# Altium PCB Copy of PCB.PcbDoc (part 5 of 5)
Units mm, origin at the board's own origin, x right, y up, seen from the top; angles counter-clockwise.
Board outline 130 x 115.04 mm, 6 copper layers (Top Layer, Int1 (GND), Int2, Int3 (PWR), Int4 (GND), Bottom Layer), stack 1.647 mm thick; 306 components, 246 nets, 1107 pads, 360 vias.
Unrouted connection lines stored in the file: 123.
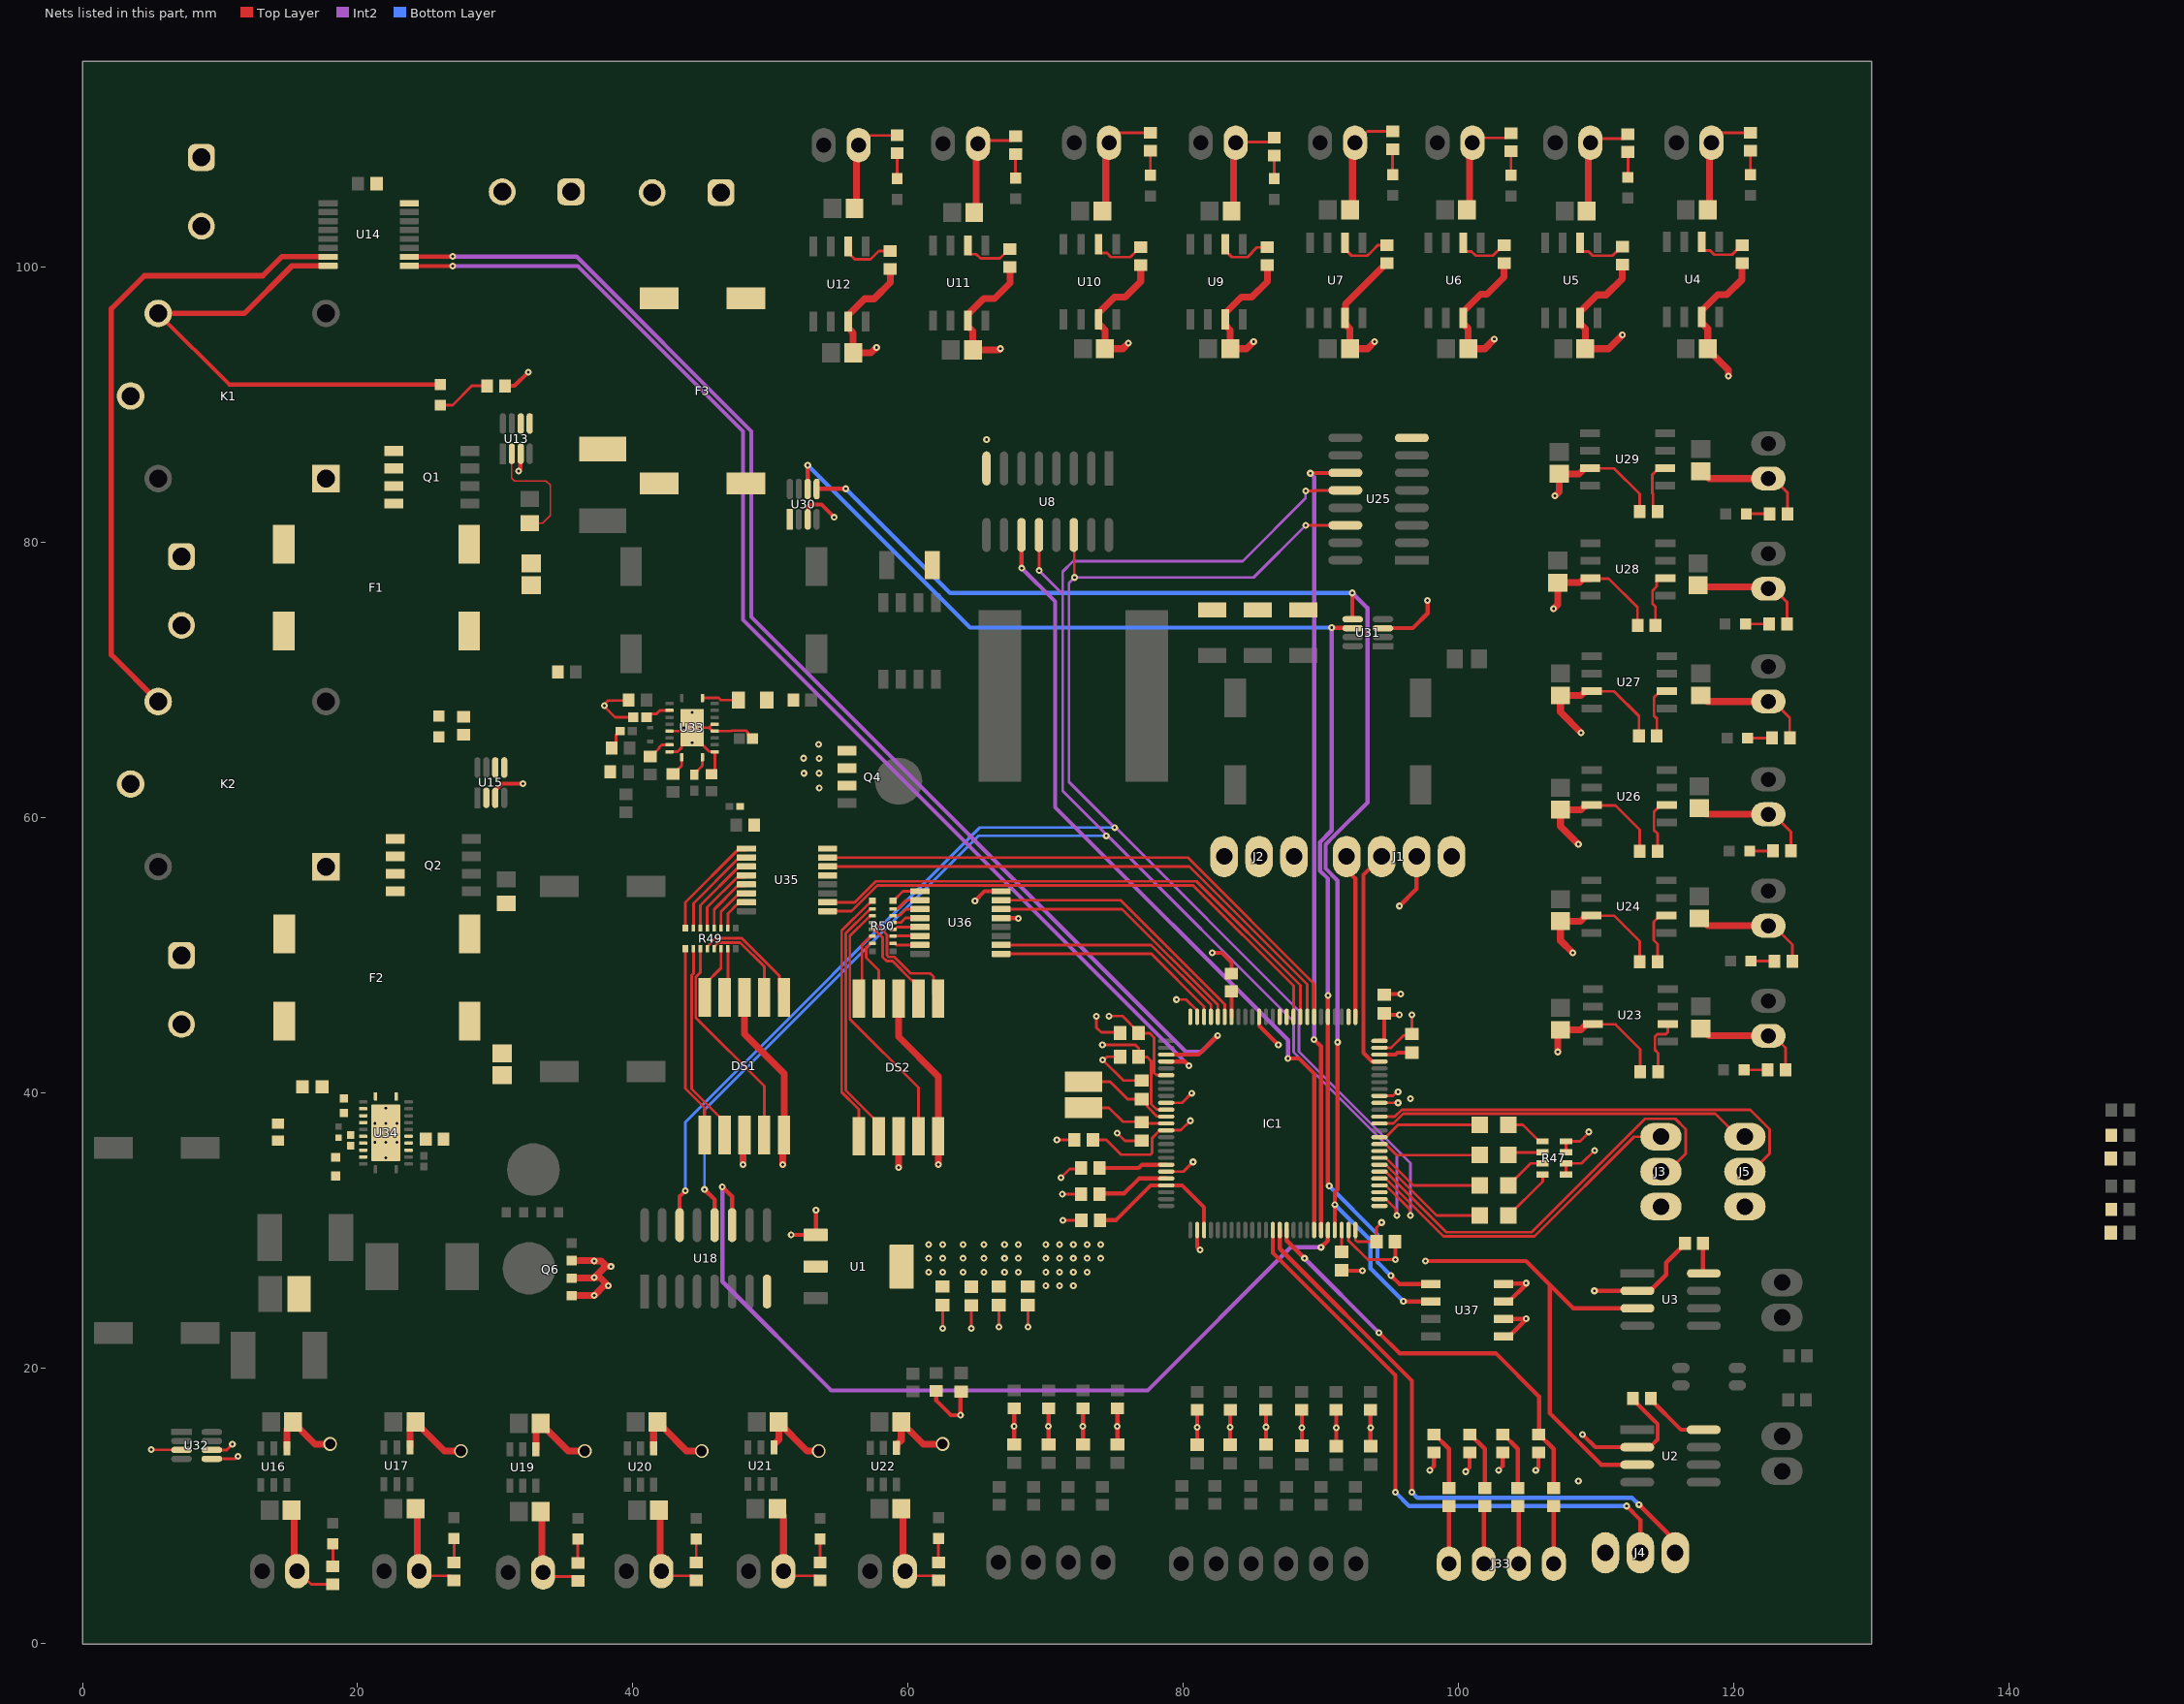
[diagram p7: the nets of this part, all layers, seen from the top]

## Via types
v1: diameter 0.5, hole 0.2, Top Layer to Bottom Layer, 354 vias
v2: diameter 1, hole 0.75, Top Layer to Bottom Layer, 6 vias

## Nets (pads, with @x,y where several pads share a name; then routed paths per layer and width w, separated by ;. In a path a pad name is that pad's centre, name@x,y a point inside that pad or via, vN(x,y) a via of type N, cw(c..) or ccw(c..) an arc to the next point about the centre after c; other vN are vias at no path point) (continued)
GND: C1.1 C2.1 C3.1 C4.1 C5.1 C6.1 C7.1 C8.1 C9.1 C10.2 C11.2 C12.1 C13.1 C14.1 C15.1 C16.1 C17.2 C18.1 C19.2 C20.1 C21.2 C22.1 C23.2 C24.1 C25.2 C26.1 C27.2 C28.1 C29.1 C30.1 C31.1 C32.1 C33.1 C34.1 C35.1 C36.1 C37.1 C38.1 C39.1 C40.1 C41.1 C42.1 C43.1 C44.1 C45.1 C46.1 C47.1 C48.2 C49.1 C50.2 C51.1 C52.2 C53.1 C54.2 C55.1 C56.2 C57.1 C58.2 C59.1 C60.1 C61.1 C62.1 C63.2 C64.1 C65.1 C66.1 C67.1 C68.1 C70.2 C71.1 C75.1 C76.1 C77.2 C78.2 C79.2 C80.2 C81.2 C82.2 C83.2 C84.2 C85.2 C86.2 C87.2 DS1.3 DS1.5 DS1.8 DS2.3 DS2.5 DS2.8 IC1.10 IC1.20 IC1.27 IC1.49 IC1.74 IC1.99 J1.1 J2.3 J3.3 J4.3 J5.3 J8.2 J9.2 J10.2 J11.2 J12.2 J13.2 J14.2 J15.2 J16.1 J17.2 J18.2 J19.1 J20.1 J21.1 J22.1 J23.1 J24.1 J25.2 J26.2 J27.2 J28.2 J29.2 J30.2 J31.1 J32.1 Q4.1 Q4.2 Q4.3 Q6.1 Q6.2 Q6.3 R1.2 R2.1 R3.1 R6.1 R7.1 R8.1 R9.1 R10.1 R11.1 R12.1 R13.1 R16.1 R17.1 R18.1 R19.1 R20.1 R21.1 R25.2 R27.2 R30.2 R31.2 R38.1 R39.1 R44.1 R46.1 R47.5 R47.6 R47.7 R47.8 R48.2 R51.2 R52.2 R53.2 R54.2 R55.2 R56.2 R57.2 R58.2 R59.2 R60.2 R61.2 R62.2 R63.2 R64.2 R65.2 R67.2 R69.2 R71.2 R73.1 R75.1 R77.1 R79.1 R81.2 R83.2 R85.2 R87.2 R89.2 R91.2 R93.2 R94.2 R95.2 R96.2 R97.2 R98.2 R99.2 U1.1 U2.2 U3.2 U4.3 U5.3 U6.3 U7.3 U8.8 U9.3 U10.3 U11.3 U12.3 U13.3 U14.8 U15.3 U16.4 U17.4 U18.8 U19.4 U20.4 U21.4 U22.4 U23.3 U24.3 U25.8 U26.3 U27.3 U28.3 U29.3 U30.3 U31.3 U32.3 U33.6 U33.9 U33.12 U33.15 U33.16 U33.21 U34.1 U34.7 U34.10 U34.16 U34.24 U34.25 U35.5 U35.8 U36.5 U36.8 U37.1 U37.2 U37.3 U37.4 | length 535.9
  Top Layer w0.2: v1(5,14.1) 5.012,14.088 7.187,14.088 U32.3@7.2,14.075 ; J19.1@15.6,5.264 15.644,5.264 16.608,4.3 R60.2@18.2,4.3 ; J20.1@24.47,5.264 24.809,4.925 26.675,4.925 R61.2@27,4.6 ; J21.1@33.47,5.164 33.759,4.875 35.675,4.875 R62.2@36,4.55 ; R38.1@39.7,68.564 39.665,68.529 38.192,68.529 38.075,68.412 38.075,68.402 37.929,68.256 37.929,68.091 38.706,67.314 C71.1@40.02,67.314 ; J22.1@42.07,5.264 42.409,4.925 44.275,4.925 R63.2@44.6,4.6 ; U33.9@42.65,64.814 43.25,64.814 43.55,65.114 43.55,65.314 43.7,65.464 v1(44.3,65.464) ; U33.6@42.65,66.314 43.55,66.314 43.7,66.464 v1(43.7,66.564) ; U33.21@44.3,66.564 44.3,66.064 45.525,64.839 45.925,64.839 U33.12@45.95,64.814 45.95,63.439 C68.1@45.7,63.189 ; v1(44.9,66.564) 45.525,66.564 ; U33.16@45.95,66.814 45.775,66.814 45.525,66.564 ; C70.2@48.677,65.764 48.655,65.764 48.375,66.044 48.375,66.177 48.208,66.344 47.194,66.344 47.164,66.314 U33.15@45.95,66.314 45.775,66.314 45.525,66.564 ; J23.1@50.94,5.264 51.279,4.925 53.275,4.925 R64.2@53.6,4.6 ; J15.2@56.4,108.9 56.444,108.9 57.144,109.6 R57.2@59.2,109.6 ; J24.1@59.77,5.264 60.109,4.925 61.875,4.925 R93.2@62.2,4.6 ; C5.1@62.492,24.606 62.5,24.598 v1(62.5,22.9) ; C6.1@64.592,24.581 64.6,24.573 v1(64.6,22.9) ; J14.2@65.07,109 65.295,109.225 67.475,109.225 R56.2@67.8,109.55 ; C3.1@66.578,24.599 66.6,24.578 v1(66.6,23) ; C4.1@68.692,24.606 68.7,24.598 v1(68.7,23) ; v1(70.803,36.606) C14.1@72.069,36.606 ; v1(71.095,33.858) 71.73,34.493 72.481,34.493 C12.1@72.558,34.57 ; v1(71.196,32.664) 72.554,32.664 C13.1@72.558,32.668 ; v1(71.247,30.759) 72.573,30.759 C8.1@72.583,30.77 ; v1(73.685,45.593) 73.685,44.755 74.016,44.425 75.347,44.425 C2.1@75.398,44.374 ; J13.2@74.6,109.064 74.644,109.064 75.38,109.8 R55.2@77.6,109.8 ; v1(75.2,37.1) 75.753,36.547 C16.1@76.962,36.547 ; C7.1@75.398,42.647 74.452,42.647 74.224,42.418 v1(74.143,42.418) 75.637,40.923 C15.1@76.962,40.923 ; IC1.20@78.75,34.3 80,34.3 v1(80.7,35) ; IC1.10@78.75,39.3 79.9,39.3 v1(80.6,40) ; v1(79.5,46.8) 80.2,46.8 81,46 IC1.99@81,45.55 ; J12.2@83.8,109.064 83.861,109.125 86.275,109.125 R54.2@86.6,109.45 ; C10.2@91.5,27.125 C10.2@91.525,27.1 ; IC1.49@92,30.05 92,29.3 93.4,27.9 v1(95.4,27.9) ; J11.2@92.47,109.064 92.514,109.064 93.35,109.9 R53.2@95.2,109.9 ; IC1.74@94.25,43.3 95.1,43.3 96,44.2 96.5,44.2 C11.2@96.6,44.3 v1(96.6,45.7) ; J10.2@101,109.064 101.361,109.425 103.475,109.425 R52.2@103.8,109.75 ; R47.5@107.8,34.1 R47.6@107.8,34.9 108.941,34.9 v1(109.88,35.839) ; R47.7@107.8,35.7 R47.8@107.8,36.5 108.814,36.5 109.449,37.135 v1(109.449,37.186) ; U29.3@109.55,85.424 109.575,85.4 111.3,85.4 113.15,83.55 R21.1@113.15,82.264 ; J9.2@109.57,109.064 109.881,109.375 111.975,109.375 R51.2@112.3,109.7 ; U28.3@109.604,77.4 110.9,77.4 113,75.3 R20.1@113,74 ; U24.3@109.675,52.9 111.3,52.9 113.15,51.05 R17.1@113.15,49.564 ; U26.3@109.675,60.929 109.704,60.9 111.4,60.9 113.15,59.15 R18.1@113.15,57.564 ; U27.3@109.675,69.229 109.704,69.2 111.3,69.2 113.1,67.4 R19.1@113.1,65.964 ; U23.3@109.775,45 111.4,45 113.2,43.2 R16.1@113.2,41.564 ; J8.2@118.37,109.064 118.414,109.064 119.15,109.8 R48.2@121.2,109.8 ; J25.2@122.5,44.164 122.875,44.164 123.75,43.289 R94.2@123.75,41.7 ; J26.2@122.5,52.164 122.875,52.164 124.25,50.789 R95.2@124.25,49.6 ; J27.2@122.5,60.264 122.875,60.264 124.15,58.989 R96.2@124.15,57.6 ; J28.2@122.5,68.464 122.875,68.464 124.058,67.281 R97.2@124.058,65.818 ; J29.2@122.5,76.664 122.875,76.664 123.861,75.678 R98.2@123.861,74.095 ; J30.2@122.5,84.664 122.875,84.664 123.9,83.639 R99.2@123.9,82.1
  Top Layer w0.3: U15.3@30,61.464 30,62.014 30.486,62.5 v1(32,62.5) ; R58.2@30.7,91.4 31.4,91.4 v1(32.4,92.4) ; v1(31.7,85.2) 31.7,85.254 31.82,85.374 31.82,86.434 U13.3@31.85,86.464 ; DS1.3@48,36.864 DS1.3@48.1,36.964 ; DS1.5@50.9,36.884 DS1.5@50.98,36.964 ; v1(51.5,29.7) U1.1@53.275,29.7 53.3,29.725 v1(53.3,31.5) ; U30.3@52.7,81.7 52.73,81.73 52.73,82.604 52.901,82.775 53.7,82.775 v1(54.625,81.85) ; R30.2@62.043,18.363 62.043,17.657 63.1,16.6 v1(63.8,16.6) 63.8,18.27 C62.1@63.843,18.313 ; DS2.5@62.18,36.864 DS2.5@62.2,36.884 ; v1(64.85,53.975) 65.55,54.675 U36.8@66.75,54.675 ; U36.5@66.75,52.725 66.757,52.718 68.004,52.718 v1(68.011,52.711) ; C81.2@67.7,14.475 v1(67.7,15.787) R79.1@67.7,17.1 ; C80.2@70.2,14.475 v1(70.2,15.787) R77.1@70.2,17.1 ; C79.2@72.7,14.475 v1(72.7,15.787) R75.1@72.7,17.1 ; C78.2@75.2,14.475 v1(75.2,15.787) R73.1@75.2,17.1 ; C87.2@81,14.45 v1(81,15.725) R91.2@81,17 ; IC1.27@81,30.05 81,28.8 v1(81.2,28.6) ; v1(82.1,50.2) 82.8,50.2 83.5,49.5 R1.2@83.5,48.7 ; C86.2@83.4,14.45 v1(83.4,15.725) R89.2@83.4,17 ; C85.2@86,14.475 v1(86,15.737) R87.2@86,17 ; C84.2@88.6,14.375 v1(88.6,15.687) R85.2@88.6,17 ; C83.2@91.1,14.35 v1(91.1,15.675) R83.2@91.1,17 ; C10.2@91.525,27.1 v1(93,27.1) ; C82.2@93.6,14.35 v1(93.6,15.675) R81.2@93.6,17 ; U31.3@94.5,73.789 96.664,73.789 97.75,74.875 97.75,75.775 v1(97.725,75.8) ; C1.1@94.6,47.15 94.65,47.2 v1(95.8,47.2) ; C9.1@95.375,29.2 95.4,29.175 v1(95.4,27.9) ; v1(97.9,12.6) 98.2,12.9 R71.2@98.2,13.9 ; v1(100.5,12.5) 100.8,12.8 R69.2@100.8,13.9 ; v1(102.9,12.6) 103.2,12.9 R67.2@103.2,13.9 ; U37.1@103.268,22.327 103.668,22.327 104.9,23.559 v1(104.9,23.6) 104.898,23.598 U37.2@103.268,23.597 U37.2@103.268,23.597 ; U37.3@103.268,24.867 103.668,24.867 104.862,26.061 104.862,26.162 v1@104.868,26.168 ; U37.4@103.268,26.137 103.3,26.168 v1@104.868,26.168 ; v1(104.9,26.2) v1@104.868,26.168 ; v1(105.6,12.6) 105.8,12.8 R65.2@105.8,13.9 ; v1(109,15.2) 109.93,14.27 U2.2@112.973,14.27 113.896,14.27 114.457,14.831 114.457,15.955 114.311,16.101 114.299,16.101 112.65,17.75 R2.1@112.65,17.8 ; v1(109.865,25.635) U3.2@112.986,25.635 113.91,25.635 115.073,26.798 115.073,27.673 116.45,29.05 R3.1@116.45,29.1
  Top Layer w0.5: U16.4@14.85,14.198 14.85,15.6 C36.1@15.3,16.05 ; C37.1@15.2,9.7 15.4,9.5 15.4,5.464 J19.1@15.6,5.264 ; C36.1@15.3,16.1 C36.1@15.3,16.05 ; v2(18,14.5) 16.9,14.5 15.75,15.65 15.7,15.65 C36.1@15.3,16.05 ; U17.4@23.8,14.264 23.804,14.268 23.804,15.704 C38.1@24.2,16.1 24.2,16.05 24.6,15.65 24.65,15.65 26.3,14 v2(27.5,14) ; C39.1@24.2,9.8 24.335,9.665 24.335,5.399 J20.1@24.47,5.264 ; U19.4@32.95,14.133 32.954,14.137 32.954,15.654 C40.1@33.3,16 33.3,15.95 33.7,15.55 33.75,15.55 35.3,14 v2(36.5,14) ; C41.1@33.3,9.6 33.385,9.515 33.385,5.249 J21.1@33.47,5.164 ; Q6.1@35.552,25.295 35.557,25.3 v1(37.2,25.3) 37.9,26 v1(38.2,26) 37.6,26.6 v1(37.2,26.6) ; Q6.2@35.552,26.565 37.165,26.565 v1(37.2,26.6) ; Q6.3@35.552,27.835 37.165,27.835 v1(37.2,27.8) 37.7,27.8 38.1,27.4 v1(38.4,27.4) ; 38,27.4 v1(37.2,26.6) ; U20.4@41.5,14.2 41.504,14.204 41.504,15.804 C42.1@41.8,16.1 41.8,16.05 42.2,15.65 42.25,15.65 43.9,14 v2(45,14) ; C43.1@41.9,9.7 41.985,9.615 41.985,5.349 J22.1@42.07,5.264 ; v1(48,34.8) DS1.3@48,36.864 ; DS1.8@48.1,46.964 48.1,44.3 50.98,41.42 DS1.5@50.98,36.964 ; U21.4@50.25,14.267 50.25,14.521 50.254,14.525 50.307,14.525 50.6,14.818 C44.1@50.6,16.05 ; C45.1@50.5,9.8 50.5,9.75 50.94,9.31 J23.1@50.94,5.264 ; C44.1@50.6,16.1 C44.1@50.6,16.05 ; v1(50.9,34.8) DS1.5@50.9,36.884 ; v2(53.5,14) 52.65,14 C44.1@50.6,16.05 ; C32.1@56.1,104.3 56.25,104.45 56.25,108.75 J15.2@56.4,108.9 ; v1(57.7,94.2) 57.3,93.8 C31.1@56,93.8 56,95.259 55.635,95.624 U12.3@55.635,96.075 55.635,96.527 56.836,97.728 57.528,97.728 58.7,98.9 R13.1@58.7,99.9 ; U22.4@59.15,14.233 59.15,14.487 59.154,14.492 59.207,14.492 59.5,14.784 C46.1@59.5,16.05 ; v1(59.3,34.6) DS2.3@59.3,36.864 ; DS2.8@59.3,46.864 59.3,44.1 62.2,41.2 DS2.5@62.2,36.884 ; C47.1@59.5,9.8 59.635,9.665 59.635,5.399 J24.1@59.77,5.264 ; C46.1@59.5,16.1 C46.1@59.5,16.05 ; v1(62.2,34.8) DS2.5@62.2,36.864 ; v2(62.5,14.5) 61.1,14.5 59.95,15.65 59.9,15.65 C46.1@59.5,16.05 ; C30.1@64.8,104 64.935,104.135 64.935,108.865 J14.2@65.07,109 ; v1(66.7,94.1) 66.6,94 C29.1@64.7,94 64.7,95.377 64.407,95.67 64.369,95.67 64.34,95.699 U11.3@64.34,96.15 64.34,96.602 65.491,97.753 66.278,97.753 67.4,98.875 R12.1@67.4,100.05 ; C28.1@74.1,104.1 74.361,104.361 74.361,108.825 J13.2@74.6,109.064 ; v1(76,94.5) 75.6,94.1 C27.2@74.3,94.1 74.3,95.466 74.007,95.758 73.864,95.758 73.835,95.788 U10.3@73.835,96.239 73.835,96.691 74.999,97.855 75.766,97.855 76.9,98.989 R11.1@76.9,100.164 ; C26.1@83.5,104.1 83.65,104.25 83.65,108.914 J12.2@83.8,109.064 ; v1(85.1,94.6) 84.6,94.1 C25.2@83.4,94.1 83.4,95.466 83.107,95.758 83.064,95.758 83.035,95.788 U9.3@83.035,96.239 83.035,96.691 84.199,97.855 84.966,97.855 86.1,98.989 R10.1@86.1,100.164 ; C24.1@92.1,104.2 92.285,104.385 92.285,108.879 J11.2@92.47,109.064 ; v1(93.9,94.6) 93.4,94.1 C23.2@92.1,94.1 92.1,95.55 91.792,95.858 91.764,95.858 91.735,95.888 U7.3@91.735,96.339 91.764,96.369 91.764,97.328 94.75,100.314 R9.1@94.8,100.314 ; C22.1@100.6,104.2 100.8,104.4 100.8,108.864 J10.2@101,109.064 ; v1(102.6,94.8) 101.9,94.1 C21.2@100.7,94.1 100.7,95.55 100.392,95.858 100.364,95.858 100.335,95.888 U6.3@100.335,96.339 100.335,96.791 101.606,98.062 102.058,98.062 103.3,99.304 R8.1@103.3,100.314 ; v1(106.9,75.2) 107.2,75.5 C56.2@107.2,77.1 108.795,77.1 109.095,77.4 U28.3@109.604,77.4 ; v1(107,83.4) 107.007,83.4 107.3,83.693 C58.2@107.3,85 108.75,85 109.07,85.32 109.07,85.395 109.099,85.424 U29.3@109.55,85.424 ; v1(107.2,43) 107.2,44.4 C48.2@107.4,44.6 108.875,44.6 109.275,45 U23.3@109.775,45 ; v1(108.3,50.2) 107.4,51.1 C50.2@107.4,52.5 108.85,52.5 109.17,52.82 109.17,52.895 109.175,52.9 U24.3@109.675,52.9 ; v1(108.7,58.1) 107.4,59.4 C52.2@107.4,60.6 108.895,60.6 109.224,60.929 U26.3@109.675,60.929 ; v1(108.9,66.2) 107.4,67.7 C54.2@107.4,68.9 108.895,68.9 109.224,69.229 U27.3@109.675,69.229 ; C20.1@109.3,104.1 109.435,104.235 109.435,108.929 J9.2@109.57,109.064 ; v1(111.9,95.1) 110.9,94.1 C19.2@109.2,94.1 109.2,95.55 108.892,95.858 108.864,95.858 108.835,95.888 U5.3@108.835,96.339 108.835,96.791 110.054,98.01 110.71,98.01 111.9,99.2 R7.1@111.9,100.214 ; C57.1@117.4,76.9 117.518,76.782 122.382,76.782 J29.2@122.5,76.664 ; C51.1@117.5,52.7 117.55,52.7 118.086,52.164 J26.2@122.5,52.164 ; C53.1@117.5,60.7 117.55,60.7 117.986,60.264 J27.2@122.5,60.264 ; C49.1@117.6,44.7 117.65,44.7 118.186,44.164 J25.2@122.5,44.164 ; C55.1@117.6,68.9 117.65,68.9 118.086,68.464 J28.2@122.5,68.464 ; C59.1@117.6,85.2 117.65,85.2 118.186,84.664 J30.2@122.5,84.664 ; C18.1@118.1,104.2 118.235,104.335 118.235,108.929 J8.2@118.37,109.064 ; v1(119.6,92.1) 119.6,92.55 118.1,94.05 C17.2@118.1,94.1 118.1,95.55 117.716,95.934 117.699,95.934 117.67,95.963 U4.3@117.67,96.415 117.67,96.866 118.821,98.017 119.478,98.017 120.6,99.139 R6.1@120.6,100.314
  other v1: 108.7,11.8 22.05,35.314 21.25,36.434 22.05,36.434 22.85,36.434 21.25,37.794 22.05,37.794 22.85,37.794 22.05,38.914 96.5,39.6 53.543,62.179 52.426,63.246 53.518,63.246 53.518,64.313 52.4,64.338 53.492,65.354 44.3,67.664 37.929,68.174 65.7,87.5
I2C2.SCL: IC1.47 U30.5 U31.5 U32.5 U37.6 | length 105.5
  Top Layer w0.2: U32.5@9.4,13.425 11.125,13.425 v1(11.3,13.6)
  Top Layer w0.3: U30.5@53.35,83.901 53.374,83.925 v1(55.475,83.925) ; IC1.47@91,30.05 91,32.801 91.2,33.001 v1(91.2,43.7) ; v1(92.275,76.35) 92.275,74.464 U31.5@92.3,74.439 ; v1@95.975,24.875 v1(95.983,24.867) U37.6@97.968,24.867
  Int2 w0.3: v1(91.2,43.7) 91.2,55.451 90.325,56.326 90.325,58.074 90.908,58.657 93.375,61.124 93.375,75.25 v1(92.275,76.35)
  Bottom Layer w0.3: v1(55.475,83.925) 63.05,76.35 v1(92.275,76.35) ; v1(91,31.9) 93.6,29.3 93.6,27.25 v1(95.983,24.867)
I2C2.SDA: IC1.80 U30.6 U31.6 U32.6 U37.5 | length 100.6
  Top Layer w0.2: U32.6@9.4,14.075 10.475,14.075 v1(10.9,14.5)
  Top Layer w0.3: U30.6@52.7,83.901 v1(52.7,85.625) ; v1(90.5,47.1) IC1.80@90.5,45.55 90.5,33.404 90.6,33.304 v1(90.6,33.25) ; v1(90.775,73.825) 90.793,73.807 92.282,73.807 U31.6@92.3,73.789 ; v1(95.075,26.75) 95.688,26.137 U37.5@97.968,26.137
  Int2 w0.3: v1(90.5,47.1) 90.5,55.585 89.925,56.16 89.925,58.24 90.775,59.09 v1(90.775,73.825)
  Bottom Layer w0.3: v1(52.7,85.625) 64.5,73.825 v1(90.775,73.825) ; v1(90.6,33.25) 94.106,29.744 94.106,27.719 v1(95.075,26.75)
I2C3_SCL: IC1.67 U13.5 U15.5 | length 1.5
  Top Layer w0.2: IC1.67@94.25,39.8 95.219,39.8 95.519,40.1 v1(95.6,40.1)
I2C3_SDA: IC1.66 U13.6 U15.6 | length 1.3
  Top Layer w0.2: IC1.66@94.25,39.3 v1(95.6,39.3)
ILIM: R37.1 U33.11 | length 1.5
  Top Layer w0.2: R37.1@44.475,63.139 44.475,63.214 45.05,63.789 U33.11@45.05,64.414
Indicator_LED_BLU: D4.1 IC1.57 | length 8.8
  Top Layer w0.2: IC1.57@94.25,34.8 94.7,34.8 98.4,31.1 D4.1@101.523,31.1
Indicator_LED_GRN: D3.1 IC1.58 | length 8.1
  Top Layer w0.2: IC1.58@94.25,35.3 94.7,35.3 96.7,33.3 D3.1@101.523,33.3
Indicator_LED_RED: D1.1 IC1.61 | length 7.6
  Top Layer w0.2: IC1.61@94.25,36.8 94.7,36.8 95.6,37.7 D1.1@101.523,37.7
Indicator_LED_YEL: D2.1 IC1.60 | length 7.6
  Top Layer w0.2: IC1.60@94.25,36.3 94.7,36.3 95.5,35.5 D2.1@101.523,35.5
Indicator_SEG1A: IC1.82 U35.7 | length 41.6
  Top Layer w0.2: U35.7@54.15,57.125 80.325,57.125 89.5,47.95 IC1.82@89.5,45.55
Indicator_SEG1B: IC1.85 U35.1 | length 39.9
  Top Layer w0.2: U35.1@54.15,53.225 55.892,53.225 57.767,55.1 80.7,55.1 88,47.8 IC1.85@88,45.55
Indicator_SEG1C: IC1.84 U35.2 | length 40.4
  Top Layer w0.2: U35.2@54.15,53.875 56.118,53.875 57.643,55.4 80.95,55.4 88.5,47.85 IC1.84@88.5,45.55
Indicator_SEG1D: IC1.83 U35.6 | length 40.8
  Top Layer w0.2: U35.6@54.15,56.475 80.425,56.475 89,47.9 IC1.83@89,45.55
Indicator_SEG2A: IC1.95 U36.7 | length 20.3
  Top Layer w0.2: U36.7@66.75,54.025 75.425,54.025 83,46.45 IC1.95@83,45.55
Indicator_SEG2B: IC1.98 U36.1 | length 17.1
  Top Layer w0.2: U36.1@66.75,50.125 77.675,50.125 81.5,46.3 IC1.98@81.5,45.55
Indicator_SEG2C: IC1.97 U36.2 | length 17.9
  Top Layer w0.2: U36.2@66.75,50.775 77.65,50.775 82,46.425 IC1.97@82,45.55
Indicator_SEG2D: IC1.96 U36.6 | length 19.5
  Top Layer w0.2: U36.6@66.75,53.375 75.55,53.375 82.5,46.425 IC1.96@82.5,45.55
NetC69_2: C69.2 R34.1
NetC72_2: C72.2 R40.1 | length 1.5
  Top Layer w0.2: R40.1@38.45,65.064 38.775,65.389 38.775,66.049 39.04,66.314 C72.2@39.06,66.314
NetD1_2: D1.2 R47.1 | length 3
  Top Layer w0.2: D1.2@103.623,37.7 104.675,37.7 105.875,36.5 R47.1@106.1,36.5
NetD2_2: D2.2 R47.2 | length 2.6
  Top Layer w0.2: D2.2@103.623,35.5 103.823,35.7 R47.2@106.1,35.7
NetD3_2: D3.2 R47.3 | length 3.1
  Top Layer w0.2: D3.2@103.623,33.3 105.223,34.9 R47.3@106.1,34.9
NetD4_2: D4.2 R47.4 | length 4
  Top Layer w0.2: D4.2@103.623,31.1 106.1,33.577 R47.4@106.1,34.1
NetD5_2: D5.2 R48.1 | length 1.7
  Top Layer w0.2: D5.2@121.2,106.75 R48.1@121.2,108.5
NetD6_2: D6.2 R51.1 | length 1.8
  Top Layer w0.2: D6.2@112.3,106.55 R51.1@112.3,108.4
NetD7_2: D7.2 R52.1 | length 1.7
  Top Layer w0.2: D7.2@103.8,106.7 R52.1@103.8,108.45
NetD8_2: D8.2 R53.1 | length 1.8
  Top Layer w0.2: D8.2@95.2,106.75 R53.1@95.2,108.6
NetD9_2: D9.2 R54.1 | length 1.7
  Top Layer w0.2: D9.2@86.6,106.45 R54.1@86.6,108.15
NetD10_2: D10.2 R55.1 | length 1.8
  Top Layer w0.2: D10.2@77.6,106.7 R55.1@77.6,108.5
NetD11_2: D11.2 R56.1 | length 1.7
  Top Layer w0.2: D11.2@67.8,106.5 R56.1@67.8,108.25
NetD12_2: D12.2 R57.1 | length 1.8
  Top Layer w0.2: D12.2@59.2,106.45 R57.1@59.2,108.3
NetD13_2: D13.2 R58.1 | length 4
  Top Layer w0.2: D13.2@26,90 26.9,90 28.3,91.4 R58.1@29.4,91.4
NetD14_2: D14.2 R59.1
NetD15_2: D15.2 R60.1 | length 1.6
  Top Layer w0.2: R60.1@18.2,5.6 D15.2@18.2,7.25
NetD16_2: D16.2 R61.1 | length 1.7
  Top Layer w0.2: R61.1@27,5.9 D16.2@27,7.65
NetD17_2: D17.2 R62.1 | length 1.7
  Top Layer w0.2: R62.1@36,5.85 D17.2@36,7.6
NetD18_2: D18.2 R63.1 | length 1.7
  Top Layer w0.2: R63.1@44.6,5.9 D18.2@44.6,7.6
NetD19_2: D19.2 R64.1 | length 1.7
  Top Layer w0.2: R64.1@53.6,5.9 D19.2@53.6,7.6
NetD20_2: D20.2 R93.1 | length 1.7
  Top Layer w0.2: R93.1@62.2,5.9 D20.2@62.2,7.65
NetD21_2: D21.2 R94.1 | length 1.7
  Top Layer w0.2: D21.2@120.75,41.7 R94.1@122.45,41.7
NetD22_2: D22.2 R95.1 | length 1.7
  Top Layer w0.2: D22.2@121.25,49.6 R95.1@122.95,49.6
NetD23_2: D23.2 R96.1 | length 1.7
  Top Layer w0.2: D23.2@121.15,57.6 R96.1@122.85,57.6
NetD24_2: D24.2 R97.1 | length 1.8
  Top Layer w0.2: D24.2@121,65.8 122.74,65.8 R97.1@122.758,65.818
NetD25_2: D25.2 R98.1 | length 1.7
  Top Layer w0.2: D25.2@120.85,74.1 120.855,74.095 R98.1@122.561,74.095
NetD26_2: D26.2 R99.1 | length 1.7
  Top Layer w0.2: D26.2@120.9,82.1 R99.1@122.6,82.1
NetDS1_1: DS1.1 R49.9 | length 14.1
  Top Layer w0.2: R49.9@43.813,50.5 43.813,40.337 45.22,38.93 DS1.1@45.22,36.964
NetDS1_2: DS1.2 R49.10 | length 14.6
  Top Layer w0.2: R49.10@44.4,50.5 44.4,48.701 44.27,48.571 44.27,40.304 46.66,37.914 DS1.2@46.66,36.964
NetDS1_4: DS1.4 R49.11 | length 15.7
  Top Layer w0.2: R49.11@44.9,50.5 44.9,48.777 44.57,48.447 44.57,45.481 49.54,40.511 DS1.4@49.54,36.964
NetDS1_6: DS1.6 R49.12 | length 8.5
  Top Layer w0.2: R49.12@45.4,50.5 45.4,50.625 45.566,50.791 45.566,50.824 45.992,51.25 47.907,51.25 50.63,48.527 50.63,47.314 DS1.6@50.98,46.964
NetDS1_7: DS1.7 R49.13 | length 6.9
  Top Layer w0.2: R49.13@45.9,50.5 45.9,50.625 46.066,50.791 46.066,50.824 46.192,50.95 47.783,50.95 49.54,49.193 DS1.7@49.54,46.964
NetDS1_9: DS1.9 R49.15 | length 3.6
  Top Layer w0.2: DS1.9@46.66,46.964 46.9,47.204 R49.15@46.9,50.5
NetDS1_10: DS1.10 R49.14 | length 4
  Top Layer w0.2: DS1.10@45.22,46.964 45.22,47.914 46.4,49.094 R49.14@46.4,50.5
NetDS2_1: DS2.1 R50.9 | length 18.6
  Top Layer w0.2: DS2.1@56.42,36.864 56.42,38.83 55.17,40.08 55.17,51.828 57.076,53.734 57.109,53.734 57.362,53.987 R50.9@57.4,53.987
NetDS2_2: DS2.2 R50.10 | length 18.4
  Top Layer w0.2: R50.10@57.4,53.4 57.275,53.4 57.109,53.234 57.076,53.234 55.47,51.628 55.47,40.204 57.86,37.814 DS2.2@57.86,36.864
NetDS2_4: DS2.4 R50.11 | length 18.9
  Top Layer w0.2: R50.11@57.4,52.9 57.275,52.9 57.109,52.734 57.076,52.734 55.77,51.428 55.77,45.381 60.74,40.411 DS2.4@60.74,36.864
NetDS2_6: DS2.6 R50.12 | length 8.7
  Top Layer w0.2: R50.12@57.4,52.4 57.525,52.4 57.691,52.234 57.724,52.234 58.45,51.508 58.45,50.017 58.567,49.9 58.991,49.9 60.191,48.7 61.6,48.7 61.83,48.47 61.83,47.214 DS2.6@62.18,46.864
NetDS2_7: DS2.7 R50.13 | length 6.8
  Top Layer w0.2: R50.13@57.4,51.9 57.525,51.9 57.7,51.725 57.733,51.725 58.15,51.308 58.15,49.893 58.443,49.6 58.867,49.6 60.303,48.164 60.39,48.164 60.74,47.814 DS2.7@60.74,46.864
NetDS2_9: DS2.9 R50.15 | length 4.7
  Top Layer w0.2: R50.15@57.4,50.9 57.275,50.9 57.109,50.734 57.076,50.734 56.95,50.608 56.95,49.841 57.86,48.931 DS2.9@57.86,46.864
NetDS2_10: DS2.10 R50.14 | length 5
  Top Layer w0.2: DS2.10@56.42,46.864 56.65,47.094 56.65,50.808 57.076,51.234 57.109,51.234 57.275,51.4 R50.14@57.4,51.4
NetF1_2_1: F1.2_1 F1.2_2 J17.1
NetF2_2_1: F2.2_1 F2.2_2 J18.1
NetIC1_94: IC1.94 R1.1 | length 1.8
  Top Layer w0.3: IC1.94@83.5,45.55 R1.1@83.5,47.4
NetR2_2: R2.2 U2.8 | length 4.8
  Top Layer w0.3: R2.2@113.95,17.8 113.95,17.75 116.16,15.54 U2.8@117.8,15.54
NetR3_2: R3.2 U3.8 | length 2.2
  Top Layer w0.3: R3.2@117.75,29.1 117.75,26.969 U3.8@117.814,26.905
NetR6_2: R6.2 U4.6 | length 3.9
  Top Layer w0.2: U4.6@117.67,101.864 117.67,101.413 117.849,101.233 118.278,101.233 118.578,100.933 119.869,100.933 120.55,101.614 R6.2@120.6,101.614
NetR7_2: R7.2 U5.6 | length 4
  Top Layer w0.2: U5.6@108.835,101.789 108.835,101.337 109.014,101.158 109.443,101.158 109.743,100.858 111.194,100.858 111.85,101.514 R7.2@111.9,101.514
NetR8_2: R8.2 U6.6 | length 3.9
  Top Layer w0.2: U6.6@100.335,101.789 100.335,101.337 100.514,101.158 100.943,101.158 101.243,100.858 102.494,100.858 103.25,101.614 R8.2@103.3,101.614
NetR9_2: R9.2 U7.6 | length 4
  Top Layer w0.2: U7.6@91.735,101.789 91.735,101.337 92.214,100.858 93.367,100.858 93.741,101.231 93.741,101.241 94.114,101.614 R9.2@94.8,101.614
NetR10_2: R10.2 U9.6 | length 4
  Top Layer w0.2: U9.6@83.035,101.689 83.035,101.237 83.514,100.758 84.667,100.758 84.996,101.087 84.996,101.135 85.325,101.464 R10.2@86.1,101.464
NetR11_2: R11.2 U10.6 | length 4
  Top Layer w0.2: U10.6@73.835,101.689 73.835,101.237 74.014,101.058 74.443,101.058 74.743,100.758 76.144,100.758 76.85,101.464 R11.2@76.9,101.464
NetR12_2: R12.2 U11.6 | length 4
  Top Layer w0.2: U11.6@64.34,101.6 64.34,101.149 64.519,100.969 64.948,100.969 65.248,100.669 66.669,100.669 67.35,101.35 R12.2@67.4,101.35
NetR13_2: R13.2 U12.6 | length 4
  Top Layer w0.2: U12.6@55.635,101.525 55.635,101.073 56.114,100.594 57.267,100.594 57.873,101.2 R13.2@58.7,101.2
NetR16_2: R16.2 U23.6 | length 4.3
  Top Layer w0.2: R16.2@114.5,41.564 114.5,42.912 114.269,43.143 114.269,44.116 114.433,44.28 115.036,44.28 115.2,44.445 U23.6@115.2,45.024
NetR17_2: R17.2 U24.6 | length 4.1
  Top Layer w0.2: R17.2@114.45,49.564 114.45,50.837 114.169,51.118 114.169,52.445 114.649,52.924 U24.6@115.1,52.924
NetR18_2: R18.2 U26.6 | length 4.1
  Top Layer w0.2: R18.2@114.45,57.564 114.45,58.852 114.194,59.108 114.194,60.45 114.673,60.929 U26.6@115.125,60.929
NetR19_2: R19.2 U27.6 | length 4
  Top Layer w0.2: R19.2@114.4,65.964 114.4,67.227 114.194,67.433 114.194,68.75 114.673,69.229 U27.6@115.125,69.229
NetR20_2: R20.2 U28.6 | length 4.2
  Top Layer w0.2: R20.2@114.3,74 114.3,75.345 114.094,75.551 114.094,76.521 114.394,76.821 114.394,77.25 114.573,77.429 U28.6@115.025,77.429
NetR21_2: R21.2 U29.6 | length 4
  Top Layer w0.2: R21.2@114.45,82.264 114.125,82.589 114.125,83.55 114.069,83.606 114.069,84.945 114.549,85.424 U29.6@115,85.424
NetR43_2: R43.2 U34.17
NetR45_2: R45.2 U34.5
NetR46_2: R46.2 U34.3
NetR49_2: R49.2 U35.15 | length 2.7
  Top Layer w0.2: R49.2@46.9,52 46.9,53.054 47.596,53.75 48.125,53.75 U35.15@48.25,53.875
NetR49_3: R49.3 U35.14 | length 3.6
  Top Layer w0.2: R49.3@46.4,52 46.4,53.204 47.596,54.4 48.125,54.4 U35.14@48.25,54.525
NetR49_4: R49.4 U35.13 | length 4.5
  Top Layer w0.2: R49.4@45.9,52 45.9,53.354 47.596,55.05 48.125,55.05 U35.13@48.25,55.175
NetR49_5: R49.5 U35.12 | length 5.3
  Top Layer w0.2: R49.5@45.4,52 45.4,53.504 47.596,55.7 48.125,55.7 U35.12@48.25,55.825
NetR49_6: R49.6 U35.11 | length 6.2
  Top Layer w0.2: R49.6@44.9,52 44.9,53.654 47.596,56.35 48.125,56.35 U35.11@48.25,56.475
NetR49_7: R49.7 U35.10 | length 7
  Top Layer w0.2: R49.7@44.4,52 44.4,53.804 47.596,57 48.125,57 U35.10@48.25,57.125
NetR49_8: R49.8 U35.9 | length 7.9
  Top Layer w0.2: R49.8@43.813,52 43.813,53.866 47.596,57.65 48.125,57.65 U35.9@48.25,57.775
NetR50_2: R50.2 U36.15 | length 2
  Top Layer w0.2: R50.2@58.9,50.9 59.025,50.9 59.15,50.775 U36.15@60.85,50.775
NetR50_3: R50.3 U36.14 | length 2
  Top Layer w0.2: R50.3@58.9,51.4 59.025,51.4 59.05,51.425 U36.14@60.85,51.425
NetR50_4: R50.4 U36.13 | length 2
  Top Layer w0.2: R50.4@58.9,51.9 59.025,51.9 59.2,52.075 U36.13@60.85,52.075
NetR50_5: R50.5 U36.12 | length 2.1
  Top Layer w0.2: R50.5@58.9,52.4 59.475,52.4 59.8,52.725 U36.12@60.85,52.725
NetR50_6: R50.6 U36.11 | length 2.1
  Top Layer w0.2: R50.6@58.9,52.9 58.925,52.925 59.4,52.925 59.85,53.375 U36.11@60.85,53.375
NetR50_7: R50.7 U36.10 | length 2.2
  Top Layer w0.2: R50.7@58.9,53.4 58.925,53.425 59.25,53.425 59.85,54.025 U36.10@60.85,54.025
NetR50_8: R50.8 U36.9 | length 2.2
  Top Layer w0.2: R50.8@58.9,53.987 58.937,53.987 59.625,54.675 U36.9@60.85,54.675
nRST: C14.2 IC1.14 J1.2 | length 13.3
  Top Layer w0.2: C14.2@73.419,36.606 73.424,36.601 74.397,36.601 75.463,35.535 77.607,35.535 77.724,35.652 77.724,36.724 78.3,37.3 IC1.14@78.75,37.3 79.8,37.3 v1(80.5,38)
  Top Layer w0.3: v1(95.7,53.6) 96.94,54.84 J1.2@96.94,57.2
OSC_IN: C15.2 IC1.12 Y1.1 | length 7.2
  Top Layer w0.2: Y1.1@72.746,40.838 72.751,40.843 74.676,40.843 75.946,39.573 77.012,39.573 77.362,39.223 77.362,39.04 78.083,38.319 78.731,38.319 IC1.12@78.75,38.3
OSC_OUT: C16.2 IC1.13 Y1.2 | length 6.5
  Top Layer w0.2: Y1.2@72.746,38.938 74.6,38.938 75.616,37.922 76.937,37.922 C16.2@76.962,37.897 77.059,37.8 IC1.13@78.75,37.8
PGOOD: R33.2 U33.10 | length 1.5
  Top Layer w0.2: R33.2@42.9,63.189 42.95,63.189 43.55,63.789 U33.10@43.55,64.414
PWM1_OUT: C33.2 F1.1_1 F1.1_2 R14.2 U13.2 | length 8.7
  Top Layer w0.1: U13.2@31.2,86.464 31.2,84.7 31.4,84.5 33.7,84.5 34,84.2 34,82 33.425,81.425 R14.2@32.5,81.425
PWM2_OUT: C35.2 F2.1_1 F2.1_2 R15.2 U15.2
PWM_In1: IC1.40 R65.1 R66.2 | length 30.9
  Top Layer w0.3: IC1.40@87.5,30.05 87.5,29.3 v1(88.8,28) ; v1(94.2,22.6) 95.7,21.1 102.7,21.1 105.85,17.95 105.85,15.2 106.9,14.15 R66.2@106.9,11.3
  Int2 w0.3: v1(88.8,28) v1(94.2,22.6)
PWM_In2: IC1.77 R67.1 R68.2 | length 4.4
  Top Layer w0.3: R67.1@103.2,15.2 103.25,15.2 104.3,14.15 R68.2@104.3,11.3
PWM_In3: IC1.90 R69.1 R70.2 | length 7
  Top Layer w0.3: IC1.90@85.5,45.55 85.5,44.9 v1(86.9,43.5) ; R69.1@100.8,15.2 100.85,15.2 101.9,14.15 R70.2@101.9,11.3
PWM_In4: IC1.59 R71.1 R72.2 | length 4.4
  Top Layer w0.3: R71.1@98.2,15.2 98.25,15.2 99.3,14.15 R72.2@99.3,11.3
PWM_IN12V1: J33.1 R66.1 | length 4.2
  Top Layer w0.3: R66.1@106.9,10 106.91,9.99 J33.1@106.91,5.8
PWM_IN12V2: J33.2 R68.1 | length 4.2
  Top Layer w0.3: R68.1@104.3,10 104.37,9.93 J33.2@104.37,5.8
PWM_IN12V3: J33.3 R70.1 | length 4.2
  Top Layer w0.3: J33.3@101.83,5.8 101.83,9.93 R70.1@101.9,10
PWM_IN12V4: J33.4 R72.1 | length 4.2
  Top Layer w0.3: J33.4@99.29,5.8 99.29,9.99 R72.1@99.3,10
PWR: J16.2 K1.3 K2.3
RLY1_OUT: K1.1 Q1.5 Q1.6 Q1.7 Q1.8
RLY2_OUT: K2.1 Q2.5 Q2.6 Q2.7 Q2.8
RLY_1: D13.1 K1.5 U14.16 | length 36.4
  Top Layer w0.3: K1.5@5.5,96.664 10.664,91.5 D13.1@26,91.5
  Top Layer w0.4: K1.5@5.5,96.664 11.764,96.664 15.225,100.125 U14.16@17.85,100.125
RLY_2: D14.1 K2.5 U14.15 | length 47.3
  Top Layer w0.4: K2.5@5.5,68.464 2.1,71.864 2.1,97 4.5,99.4 13.1,99.4 14.5,100.8 17.825,100.8 U14.15@17.85,100.775
RLY_CTRL_1: IC1.4 U14.1 | length 90.5
  Top Layer w0.3: U14.1@23.75,100.125 23.763,100.112 26.886,100.112 v1(26.899,100.1) ; IC1.4@78.75,42.3 80.1,42.3 v1(80.4,42)
  Int2 w0.3: v1(26.899,100.1) 36,100.1 48,88.1 48,74.4 v1(80.4,42)
RLY_CTRL_2: IC1.3 U14.2 | length 95.4
  Top Layer w0.3: U14.2@23.75,100.775 23.762,100.787 26.888,100.787 v1(26.9,100.8) ; IC1.3@78.75,42.8 81.1,42.8 v1(82.492,44.192)
  Int2 w0.3: v1(26.9,100.8) 35.9,100.8 48.6,88.1 48.6,74.6 80.2,43 81.3,43 v1(82.492,44.192)
RT: R38.2 U33.2 | length 1.8
  Top Layer w0.2: R38.2@41,68.564 41.672,68.564 41.922,68.314 U33.2@42.65,68.314
RT: R44.2 U34.4
SPI2_MISO: IC1.53
SPI2_MOSI: IC1.54 U8.14 U18.14 U25.14 | length 132.3
  Top Layer w0.2: U8.14@72.04,80.568 72.07,80.538 72.07,77.505 v1(72.1,77.475) ; v1(88.9,81.275) 88.902,81.272 91.765,81.272 U25.14@91.768,81.27 ; IC1.54@94.25,33.3 94.7,33.3 96.443,31.557 96.443,31.157 v1(96.5,31.1)
  Top Layer w0.3: U18.14@43.395,30.416 43.395,32.495 v1(43.8,32.9)
  Int2 w0.2: v1(88.9,81.275) 85.1,77.475 v1(72.1,77.475) 71.688,77.063 71.688,62.612 v1(75,59.3) 75.075,59.3 88.4,45.975 88.4,43.025 96.5,34.925 v1(96.5,31.1)
  Bottom Layer w0.2: v1(43.8,32.9) 43.8,37.895 65.205,59.3 v1(75,59.3)
SPI2_NSS: IC1.51
SPI2_SCK: IC1.52 U8.12 U18.12 U25.12 | length 133.2
  Top Layer w0.2: U8.12@69.5,80.568 69.513,80.555 69.513,77.987 v1(69.525,77.975) ; v1(88.9,83.775) 89.533,83.775 89.55,83.792 91.75,83.792 U25.12@91.768,83.81 ; IC1.52@94.25,32.3 94.7,32.3 95.443,31.557 95.443,31.157 v1(95.5,31.1)
  Top Layer w0.3: v1(45.2,33) 45.935,32.265 U18.12@45.935,30.416
  Int2 w0.2: v1(69.525,77.975) 71.226,76.274 ; v1@74.6,58.6 71.226,61.974 71.226,76.274 ; 74.639,58.561 88.011,45.189 88.011,42.977 95.5,35.488 v1(95.5,31.1) ; v1(88.9,83.775) 88.875,83.75 88.875,83.225 84.3,78.65 71.975,78.65 71.226,77.901 71.226,76.274
  Bottom Layer w0.2: v1(45.2,33) 45.2,38.8 65.1,58.7 v1(74.4,58.7)
SR_Latch_5V_LS: IC1.46 U18.11 | length 62.5
  Top Layer w0.3: v1(46.5,33.2) 47.205,32.495 U18.11@47.205,30.416 ; v1(90,28.8) 90.5,29.3 IC1.46@90.5,30.05
  Int2 w0.3: v1(46.5,33.2) 46.5,26.3 54.4,18.4 77.4,18.4 87.8,28.8 v1(90,28.8)
SR_Latch_12V_LS: IC1.45 U25.11 | length 57.9
  Top Layer w0.3: v1(89.225,85.05) 89.24,85.065 91.753,85.065 U25.11@91.768,85.08 ; v1(89.5,43.9) 90,43.4 IC1.45@90,30.05
  Int2 w0.3: v1(89.225,85.05) 89.5,84.774 v1(89.5,43.9)
SR_Latch_24V_LS: IC1.44 U8.11 | length 59.8
  Top Layer w0.3: U8.11@68.23,80.568 68.24,80.558 68.24,78.16 v1(68.25,78.15) ; v1(87.6,42.525) 88.396,42.525 89.5,41.421 IC1.44@89.5,30.05
  Int2 w0.3: v1(68.25,78.15) 70.675,75.725 70.675,60.776 87.6,43.851 v1(87.6,42.525)
SS_TRK: C71.2 U33.3 | length 1.9
  Top Layer w0.2: C71.2@41,67.314 41.26,67.574 41.717,67.574 41.957,67.814 U33.3@42.65,67.814
ST_3V3: C1.2 C2.2 C3.2 C4.2 C5.2 C6.2 C7.2 C8.2 C9.2 C12.2 C13.2 IC1.6 IC1.11 IC1.19 IC1.21 IC1.22 IC1.28 IC1.50 IC1.75 IC1.100 U1.2 U1.4 U2.3 U3.3 | length 78.8
  Top Layer w0.2: v1(74.117,43.51) 76.505,43.51 76.759,43.256 76.759,42.636 76.773,42.621 77.368,42.621 77.662,42.328 77.662,39.203 78.046,38.819 78.731,38.819 IC1.11@78.75,38.8 ; v1(74.6,45.6) 75.572,45.6 76.748,44.424 C2.2@76.748,44.374 76.773,44.348 77.572,44.348 77.876,44.044 77.876,41.478 78.035,41.319 78.731,41.319 IC1.6@78.75,41.3 ; IC1.50@92.5,30.05 92.5,29.317 92.617,29.2 C9.2@94.025,29.2 94.025,30.225 v1(94.4,30.6)
  Top Layer w0.3: C13.2@73.908,32.668 73.955,32.715 75.692,32.715 76.777,33.8 IC1.21@78.75,33.8 ; C12.2@73.908,34.57 76.759,34.57 76.989,34.8 IC1.19@78.75,34.8 ; C8.2@73.933,30.77 75.093,30.77 77.623,33.3 IC1.22@78.75,33.3 79.9,33.3 81.5,31.7 IC1.28@81.5,30.05 ; IC1.75@94.25,43.8 94.6,43.8 C1.2@94.6,45.8 94.7,45.7 v1(95.7,45.7) ; v1(97.6,27.8) 104.9,27.8 106.617,26.083 ; U2.3@112.973,13 110.351,13 106.617,16.734 106.617,26.083 ; U3.3@112.986,24.365 108.335,24.365 106.617,26.083
  other v1: 70,26 71,26 72,26 61.5,27 62.5,27 64,27 65.5,27 67,27 68,27 70,27 71,27 72,27 73,27 61.5,28 62.5,28 64,28 65.5,28 67,28 68,28 70,28 71,28 72,28 73,28 74,28 61.5,29 62.5,29 64,29 65.5,29 67,29 68,29 70,29 71,29 72,29 73,29 74,29
SWCLK: IC1.76 J1.4 | length 11.9
  Top Layer w0.3: J1.4@91.86,57.2 91.86,56.24 92.5,55.6 IC1.76@92.5,45.55
SWDIO: IC1.72 J1.3 | length 16.3
  Top Layer w0.3: IC1.72@94.25,42.3 93.7,42.3 93.075,42.925 93.075,55.875 J1.3@94.4,57.2
SYNCIN: R36.2 U33.8 | length 1.8
  Top Layer w0.2: R36.2@41.25,64.464 41.3,64.464 41.908,65.072 41.908,65.122 42.1,65.314 U33.8@42.65,65.314
UART5_RX: IC1.38 J4.2 | length 43.8
  Top Layer w0.3: IC1.38@86.5,30.05 86.5,28.4 95.4,19.5 v1(95.4,11) ; v1(112.2,10) 113.2,9 J4.2@113.2,6.6
  Bottom Layer w0.3: v1(95.4,11) 96.4,10 v1(112.2,10)
UART5_TX: IC1.39 J4.1 | length 44.5
  Top Layer w0.3: IC1.39@87,30.05 87,28.7 96.6,19.1 v1(96.6,11) ; v1(113.1,10.1) 115.74,7.46 J4.1@115.74,6.6
  Bottom Layer w0.3: v1(96.6,11) 97,10.6 112.6,10.6 v1(113.1,10.1)
USART2_RX: IC1.87 J2.2
USART2_TX: IC1.86 J2.1
USART3_RX: IC1.56 J3.2 | length 31.9
  Top Layer w0.2: IC1.56@94.25,34.3 94.7,34.3 99.1,29.9 105.3,29.9 113.54,38.14 115.738,38.14 116.5,37.378 116.5,35.6 115.2,34.3 J3.2@114.7,34.3
USART3_TX: IC1.55 J3.1 | length 25.2
  Top Layer w0.2: IC1.55@94.25,33.8 94.7,33.8 98.9,29.6 105.514,29.6 112.754,36.84 J3.1@114.7,36.84
USART6_RX: IC1.64 J5.2 | length 33.3
  Top Layer w0.2: IC1.64@94.25,38.3 95.351,38.3 95.851,38.8 121.178,38.8 122.6,37.378 122.6,35.6 121.3,34.3 J5.2@120.8,34.3
USART6_TX: IC1.63 J5.1 | length 27.5
  Top Layer w0.2: IC1.63@94.25,37.8 95.276,37.8 95.976,38.5 118.64,38.5 120.3,36.84 J5.1@120.8,36.84
VBATT: F3.2_1 F3.2_2 R22.1 U30.1
VBATT_NOFUSE: F3.1_1 F3.1_2 J31.2 J32.2
VCAP1: C10.1 IC1.48 | length 1.6
  Top Layer w0.2: C10.1@91.5,28.475 IC1.48@91.5,30.05
VCAP2: C11.1 IC1.73 | length 2.4
  Top Layer w0.3: IC1.73@94.25,42.8 95.4,42.8 95.55,42.95 C11.1@96.6,42.95
VCC: C70.1 R33.1 R36.1 U33.14 | length 4.5
  Top Layer w0.2: R36.1@41.25,63.164 41.3,63.114 41.3,62.255 41.667,61.889 R33.1@42.9,61.889 ; U33.14@45.95,65.814 46.125,65.814 46.175,65.764 C70.1@47.723,65.764
VCC: C76.2 R43.1 U34.9
VDDA: C75.2 R41.2 R45.1 U34.8 U34.18
VIN: C63.1 R32.1 U33.20 | length 2.7
  Top Layer w0.2: U33.20@45.05,68.714 46.229,68.714 46.379,68.564 C63.1@47.675,68.564
pads on no net: IC1.5 IC1.7 IC1.8 IC1.9 IC1.15 IC1.16 IC1.17 IC1.37 IC1.41 IC1.42 IC1.62 IC1.65 IC1.68 IC1.69 IC1.78 IC1.79 IC1.81 IC1.88 IC1.89 K1.4 K2.4 R49.1 R49.16 R50.1 R50.16 U2.5 U3.5 U4.4 U5.4 U6.4 U7.4 U8.9 U9.4 U10.4 U11.4 U12.4 U13.7 U13.8 U14.3 U14.4 U14.5 U14.6 U14.7 U14.10 U14.11 U14.12 U14.13 U14.14 U15.7 U15.8 U18.6 U18.7 U18.9 U23.4 U24.4 U25.6 U25.7 U25.9 U26.4 U27.4 U28.4 U29.4 U30.7 U30.8 U31.7 U31.8 U32.7 U32.8 U33.7 U33.17 U34.2 U34.22 U34.23
copper on no net: | length 540.3
  Top Layer w0.254: 0,0 130,0 130,115 0,115 0,0 ; 7,7.964 ccw(c5,7.964) 7,7.964 ; 21.9,110.8 ccw(c19.9,110.8) 21.9,110.8 ; 125.6,5.4 ccw(c123.6,5.4) 125.6,5.4 ; 128.2,110.7 ccw(c126.2,110.7) 128.2,110.7

## Polygon pours and split planes (outlines as drawn)
12VREG_IN on Top Layer "12VREG_IN_L01_P015" (solid, pour order 15): 52,80.1 52,80 52,69.9 52.7,69.2 52.7,68 53.3,68 53.3,69 55.7,71.4 63,71.4 63,76.3 62.5,76.8 60.7,76.8 60.7,78.7 59.3,80.1
12VCC_NOSENS on Top Layer "12VCC_NOSENS_L01_P018" (solid, pour order 18): 93.701,72.725 100.5,72.725 100.5,70.3 99.6,70.3 98.7,69.4 98.7,60.3 95.7,60.3 95.7,70.3 93.7,72.3
5VCC on Top Layer "5VCC_L01_P043" (solid, remove dead copper, pour order 43): 31,21.267 32.129,20.2 55.9,20.2 58.5,17.6 58.5,13.1 56.6,13.1 52.3,17.4 49.6,17.4 49.6,13.4 47.7,13.4 43.7,17.4 40.8,17.4 40.8,13.3 38.9,13.3 34.8,17.4 32.3,17.4 32.3,13.2 30.4,13.2 26.2,17.4 23.1,17.4 23.1,13.3 21.1,13.3 17.103,17.297 14.2,17.297 14.2,13.3 12.3,13.3 12.3,17.297 14.303,19.075 15.138,19.911 15.138,23.241 30.259,23.241 31,22.5
ST_3V3 on Top Layer "ST_3V3_L01_P061" (solid, pour order 61): 52.248,27.991 52.248,26.848 56.566,26.848 58.141,25.273 72.695,25.273 74.803,27.381 74.803,35.585 73.33,35.585 73.33,30.201 72.669,29.54 58.014,29.54 56.515,28.042
5VCC_NOSENS on Top Layer "5VCC_NOSENS_L01_P042" (solid, remove dead copper, pour order 42): 2,24.7 2,20.7 2.1,20.8 7.188,20.8 10.873,18.542 13.36,18.542 13.36,23.139 11.608,23.139 10.047,24.7
GND on Top Layer "GND_L01_P060" (solid, pour order 60): 56.667,66.015 56.667,61.595 52.883,61.595 51.689,62.789 51.689,64.77 52.934,66.015
5VREG_OUT on Top Layer "5VREG_OUT_L01_P039" (solid, pour order 39): 30.009,32.156 34.061,32.156 34.061,30.759 34.836,29.985 34.836,24.613 29.254,24.613 28.67,25.197 25.933,25.197 25.933,29.631 28.066,29.631
24VCC on Top Layer "24VCC_L01_P028" (solid, pour order 28): 32.4,56.5 32.4,53.4 33.8,53.4 34.5,52.7 34.5,51.7 41.2,51.7 41.2,52.9 41.7,53.4 43.2,53.4 43.2,56.6 42.4,56.6 40.8,58.2 34.8,58.2 33.1,56.5
5VCC on Top Layer "5VCC_L01_P051" (solid, remove dead copper, pour order 51): 50.9,20 51.8,20.9 51.8,26 54.7,26 54.7,21.4 56.1,20
5V_6_POWER on Top Layer "5V_6_POWER_L01_P049" (solid, pour order 49): 56.17,12.8 58.5,12.8 58.5,7.07 58.67,6.9 58.67,3.5 55.87,3.5 55.87,9 56.17,9.3
5V_5_POWER on Top Layer "5V_5_POWER_L01_P048" (solid, pour order 48): 47.34,12.8 49.54,12.8 49.54,7.2 49.84,6.9 49.84,3.5 47.04,3.5 47.04,9 47.34,9.3
5V_4_POWER on Top Layer "5V_4_POWER_L01_P047" (solid, pour order 47): 38.47,12.8 40.8,12.8 40.8,7.07 40.97,6.9 40.97,3.5 38.17,3.5 38.17,9 38.47,9.3
5V_3_POWER on Top Layer "5V_3_POWER_L01_P046" (solid, pour order 46): 29.87,12.7 32.2,12.7 32.2,6.97 32.37,6.8 32.37,3.4 29.57,3.4 29.57,8.9 29.87,9.2
5V_2_POWER on Top Layer "5V_2_POWER_L01_P045" (solid, pour order 45): 20.87,12.8 23.07,12.8 23.07,7.2 23.37,6.9 23.37,3.5 20.57,3.5 20.57,9 20.87,9.3
5V_1_POWER on Top Layer "5V_1_POWER_L01_P044" (solid, pour order 44): 12,12.8 14.2,12.8 14.2,7.2 14.5,6.9 14.5,3.5 11.7,3.5 11.7,9 12,9.3
5VREG_VOUT on Top Layer "5VREG_VOUT_L01_P041" (solid, pour order 41): 2,38 10.5,38 10.5,34.4 12.5,32.4 15.2,32.4 15.2,27.9 14.4,27.1 14.4,23.525 11.975,23.525 11.3,24.2 11.3,27.3 4.4,34.2 2,34.2
5VREG_ISNS+ on Top Layer "5VREG_ISNS+_L01_P040" (solid, remove dead copper, pour order 40): 17,31.8 21.4,31.8 23.7,29.5 23.7,24.9 19.7,24.9 17,27.6
5VREG_IN on Top Layer "5VREG_IN_L01_P001" (solid, remove dead copper, pour order 1): 32.3,43.4 43.4,43.4 43.4,39.6 36.6,32.8 29.3,32.8 29.3,37.8 32.3,39.7
24V_5_POWER on Top Layer "24V_5_POWER_L01_P034" (solid, pour order 34): 79.6,100.6 79.7,100.5 82.5,100.5 82.5,107.3 82.6,107.4 82.6,111.1 80.5,111.1 79.6,110.2 79.6,107.1 80.3,106.4 80.3,103.5 79.6,102.8
24V_6_POWER on Top Layer "24V_6_POWER_L01_P033" (solid, pour order 33): 70.3,100.3 70.4,100.2 73.2,100.2 73.2,107 73.4,107.2 73.4,110.8 71.2,110.8 70.3,109.9 70.3,106.8 71,106.1 71,103.2 70.3,102.5
24V_7_POWER on Top Layer "24V_7_POWER_L01_P032" (solid, pour order 32): 60.8,100.4 60.9,100.3 63.7,100.3 63.7,107.1 63.9,107.3 63.9,110.9 61.7,110.9 60.8,110 60.8,106.9 61.5,106.2 61.5,103.3 60.8,102.6
24V_1_POWER on Top Layer "24V_1_POWER_L01_P038" (solid, pour order 38): 114.3,100.5 114.4,100.4 117.1,100.4 117.1,107.1 117.2,107.2 117.2,111 115.2,111 114.3,110.1 114.3,107 115,106.3 115,103.4 114.3,102.7
24V_2_POWER on Top Layer "24V_2_POWER_L01_P037" (solid, pour order 37): 105.4,100.5 105.5,100.4 108.3,100.4 108.3,107.2 108.4,107.3 108.4,111 106.3,111 105.4,110.1 105.4,107 106.1,106.3 106.1,103.4 105.4,102.7
24V_3_POWER on Top Layer "24V_3_POWER_L01_P036" (solid, pour order 36): 96.8,100.5 96.9,100.4 99.7,100.4 99.7,107.2 99.9,107.4 99.9,111 97.7,111 96.8,110.1 96.8,107 97.5,106.3 97.5,103.4 96.8,102.7
24V_4_POWER on Top Layer "24V_4_POWER_L01_P035" (solid, pour order 35): 88.25,100.65 88.35,100.55 91.1,100.55 91.1,107.3 91.3,107.5 91.3,111.15 89.15,111.15 88.25,110.25 88.25,107.15 88.95,106.45 88.95,103.55 88.25,102.85
24V_8_POWER on Top Layer "24V_8_POWER_L01_P031" (solid, pour order 31): 52.3,100.3 52.4,100.2 55,100.2 55,106.8 55.2,107 55.2,110.8 53.2,110.8 52.3,109.9 52.3,106.8 53,106.1 53,103.2 52.3,102.5
24VCC on Top Layer "24VCC_L01_P030" (solid, pour order 30): 117.1,97.5 117.1,91.9 114.7,89.5 62.6,89.5 59.5,86.4 48.8,86.4 48.8,93.7 52.4,97.3 55,97.3 55,92.5 59.2,92.5 60.8,94.1 60.8,97.3 63.7,97.3 63.7,92.6 67.6,92.6 70.5,95.5 70.5,97.5 73.2,97.5 73.3,97.4 73.3,92.6 77.3,92.6 79.7,95 79.7,97.5 82.4,97.5 82.4,92.6 85.9,92.6 88.5,95.2 88.5,97.6 91.1,97.6 91.1,92.7 94.6,92.7 97.1,95.2 97.1,97.6 99.7,97.6 99.7,92.7 103.5,92.7 105.5,94.7 105.5,97.5 108.2,97.5 108.2,92.6 112,92.6 114.4,95 114.4,97.5
24VCC on Top Layer "24VCC_L01_P029" (solid, pour order 29): 41.5,69.7 47.5,75.7 47.5,78.9 43.8,78.9 41.5,81.2
12V_1_POWER on Top Layer "12V_1_POWER_L01_P027" (solid, pour order 27): 113.9,48.35 124.5,48.35 124.5,45.425 119.4,45.425 119.2,45.625 113.9,45.625
12V_2_POWER on Top Layer "12V_2_POWER_L01_P025" (solid, pour order 25): 114,56.25 124.6,56.25 124.6,53.325 119.5,53.325 119.3,53.525 114,53.525
12V_3_POWER on Top Layer "12V_3_POWER_L01_P024" (solid, pour order 24): 113.9,64.287 124.5,64.287 124.5,61.362 119.4,61.362 119.2,61.562 113.9,61.562
12V_4_POWER on Top Layer "12V_4_POWER_L01_P023" (solid, pour order 23): 113.9,72.588 124.5,72.588 124.5,69.662 119.4,69.662 119.2,69.862 113.9,69.862
12V_5_POWER on Top Layer "12V_5_POWER_L01_P022" (solid, pour order 22): 113.7,80.7 124.3,80.7 124.3,77.775 119.2,77.775 119,77.975 113.7,77.975
12V_6_POWER on Top Layer "12V_6_POWER_L01_P021" (solid, pour order 21): 113.8,89.1 124.1,89.1 124.1,85.8 119,85.8 118.8,86 113.8,86
12VCC on Top Layer "12VCC_L01_P019" (solid, pour order 19): 110.8,89 110.8,86 106,86 106,81.7 106.2,81.7 107.2,80.7 111,80.7 111,78 105.9,78 105.9,73.8 107,72.7 111,72.7 111,69.8 105.7,69.8 105.7,65.1 106.7,64.1 111.1,64.1 111.1,61.5 105.9,61.5 105.9,57.4 107.1,56.2 110.9,56.2 110.9,53.4 105.8,53.4 105.8,49.6 107,48.4 111,48.4 111,45.5 103.6,45.5 101.9,47.2 101.9,69.2 100.7,70.4 100.7,73.7 102,75 102,86.4 104.6,89
12VREG_OUT on Top Layer "12VREG_OUT_L01_P017" (solid, pour order 17): 74.9,76.2 79.1,76.2 80.3,75 80.3,73.8 81.2,72.9 90.5,72.9 90.5,70.2 85.6,65.3 85.6,60.4 82.5,60.4 81.4,61.5 74.9,61.5
24VCC on Top Layer "24VCC_L01_P014" (solid, pour order 14): 35.3,83.3 39.4,83.3 41.7,81 41.7,69.9 38.2,69.9 38.2,77.5 35.3,80.4
12VREG_SW on Top Layer "12VREG_SW_L01_P016" (solid, pour order 16): 63.1,71 63.8,71.7 63.8,76.2 69.3,76.2 69.3,60 56.8,60 56.8,71
FET1_OUT on Top Layer "FET1_OUT_L01_P009" (solid, pour order 9): 29.2,86.1 31.1,84.2 33.6,84.2 33.6,82.4 26.8,82.4 26.8,86.1
VBATT on Top Layer "VBATT_L01_P013" (solid, pour order 13): 34.9,84.3 39.2,84.3 39.2,84 40.6,82.6 50.2,82.6 50.2,85.9 43.9,85.9 40.9,88.9 40.8,88.8 34.9,88.8
VBATT_NOFUSE on Top Layer "VBATT_NOFUSE_L01_P012" (solid, pour order 12): 27.9,107.2 33.1,107.2 33.1,102.5 33.6,102 38.8,102 38.8,107.2 38.9,107.1 43.9,107.1 43.9,102.5 47.2,99.2 50.3,99.2 50.3,96.2 31.4,96.2 28,99.6
NetF1_2_1 on Top Layer "NETF1_2_1_L01_P011" (solid, pour order 11): 5.5,80.7 5.5,77.2 10.1,77.2 12.9,74.4 12.9,71.4 16,71.4 16,82 13,82 11.7,80.7
PWM1_OUT on Top Layer "PWM1_OUT_L01_P006" (solid, pour order 6): 27.1,82.1 26.8,81.8 26.8,77.9 33.7,77.9 33.7,78 33.7,82.1
PWM1_OUT on Top Layer "PWM1_OUT_L01_P007" (solid, pour order 7): 26.8,78 26.8,71.3 29.6,71.3 29.6,76.1 31.5,78
RLY1_OUT on Top Layer "RLY1_OUT_L01_P005" (solid, pour order 5): 26.384,87.024 26.384,82.504 26.38,82.5 15.5,82.5 15.5,87
ST_3V3 on Int3 (PWR) "ST_3V3_L04_P063" (solid, remove dead copper, pour order 63): 60.757,29.54 60.797,29.5 67.9,29.5 72.746,34.346 72.746,46.431 74.1,47.9 76.138,47.9 96.988,47.9 98.6,46.2 98.525,34.698 98.525,28.015 95.783,25.273 60.782,25.273
5VCC on Int3 (PWR) "5VCC_L04_P064" (solid, pour order 64): 28.5,17.4 23,11.9 5.3,11.9 3.8,13.4 3.8,16.3 5.6,18.1 13.2,18.1 16.6,21.5 16.6,105.6 18.3,107.3 23.8,107.3 25.4,105.7 25.4,100.2 30.5,95.1 38.3,95.1 38.3,90.4 32.1,84.2 30.4,84.2 30.4,50.6 33.6,47.4 41.6,47.4 44.3,50.1 44.3,68.3 50.3,74.3 50.3,82.4 52.1,84.2 61.6,84.2 65.9,88.5 94.5,88.5 99.2,83.8 99.2,66.1 96.4,63.3 84,63.3 68.9,48.2 68.9,35.8 65.9,32.8 60.3,32.8 57.7,30.2 57.7,24.2 95.7,24.2 98.7,21.2 98.7,17.4
24VCC on Int3 (PWR) "24VCC_L04_P026" (solid, pour order 26): 47.9,84.1 50,86.2 59.8,86.2 62.9,89.3 62.9,92.2 45.6,92.2 34.4,81 34.4,51.7 41.2,51.7 41.2,68.9 47.9,75.6
PWR on Int3 (PWR) "PWR_L04_P000" (solid, pour order 0): 1.5,60.5 1.5,104.5 10.5,104.5 10.5,101.5 6,101.5 4,99.5 4,94 5,93 5,88.5 4,87.5 4,65.5 5.5,64 5.5,60.5
GND on Int1 (GND) "GND_L02_P058" (solid, pour order 58): 2.5,112.5 127.5,112.5 127.5,2.5 2.5,2.5
GND on Int4 (GND) "GND_L05_P059" (solid, pour order 59): 2.5,112.5 127.5,112.5 127.5,2.5 2.5,2.5

## Silkscreen, mask and mechanical layers (free items; w line width, h text height)
Top Overlay:
  drawing of 34 lines, arcs and shapes, not listed
  text "+" at 116.213,114.275 h1.5 r180
  text "+" at 63.013,114.075 h1.5 r180
  text "+" at 81.713,114.075 h1.5 r180
  text "+" at 90.413,114.075 h1.5 r180
  text "+" at 98.913,114.075 h1.5 r180
  text "+" at 107.413,114.075 h1.5 r180
  text "+" at 72.5,114.05 h1.5 r180
  text "+" at 54.4,113.95 h1.5 r180
  text "PWM PWR" at 1.95,111.65 h2
  text "GND" at 37.5,111.2 h1 r180
  text "VCC" at 42.3,111.2 h1 r180
  text "VCC" at 31.1,111.1 h1 r180
  text "GND" at 47.2,111.1 h1 r180
  text "GND" at 1.1,107.4 h1
  text "VCC" at 1.1,102.2 h1
  text "PWM1" at 22.2,96.7 h2 r270
  text "3" at 104.2,94.7 h2 r180
  text "1" at 121.027,94.702 h2 r180
  text "2" at 112.6,94.6 h2 r180
  text "4" at 95.8,94.5 h2 r180
  text "5" at 86.8,94.4 h2 r180
  text "6" at 77.7,94.3 h2 r180
  text "7" at 68.2,94.1 h2 r180
  text "BOARD / POWER" at 27.6,94 h2
  text "8" at 59.5,93.9 h2 r180
  text "24V POWER" at 89.546,90.446 h1.52 r180
  text "Designed By: / Jacob Chisholm" at 127.4,90.2 h1.2 r90
  text "24V POWER" at 61.054,88.954 h1.52
  text "+ -" at 127.561,87.45 h1 r270
  text "MAIN / FUSE" at 48.885,85.2 h2
  text "6" at 106.8,81.6 h2 r90
  text "+ -" at 127.661,79.45 h1 r270
  text "+ -" at 0.55,79.25 h2 r270
  text "QFSAE / EV VCU" at 104.7,77.4 h2 r90
  text "5" at 106.5,73.5 h2 r90
  text "+ -" at 127.661,71.35 h1 r270
  text "PWM2" at 22.1,69 h2 r270
  text "4" at 106.7,65.5 h2 r90
  text "+ -" at 127.661,63.25 h1 r270
  text "3" at 106.6,57 h2 r90
  text "+ -" at 127.6,54.6 h1 r270
  text "UART2" at 81,54.5 h1 r90
  text "12V POWER" at 103.64,52.26 h2 r90
  text "RX" at 86.1,51.9 h1 r90
  text "TX" at 88.7,51.9 h1 r90
  text "GND" at 83.5,51.1 h1 r90
  text "RST" at 97.7,50.9 h1 r90
  text "CLK" at 92.4,50.8 h1 r90
  text "DIO" at 94.9,50.8 h1 r90
  text "GND" at 100.1,50.8 h1 r90
  text "+ -" at 0.65,49.95 h2 r270
  text "2" at 106.7,49 h2 r90
  text "+ -" at 127.6,47.1 h1 r270
  text "5V FUSE" at 33.746,43.054 h1.52 r90
  text "1" at 106.902,41.473 h2 r90
  text "UART6" at 118.473,38.635 h1
  text "UART3" at 112.4,38.6 h1
  text "TX" at 125,36.4 h1
  text "RX" at 125.1,34 h1
  text "GND" at 124.6,31.2 h1
  text "5V FUSE" at 11.146,25.054 h1.52 r90
  text "2N 2P" at 128,22.6 h1 r90
  text "5V ADC" at 66.754,19.954 h1.52
  text "12V ADC" at 81.354,19.654 h1.52
  text "CAN" at 110.346,19.454 h1.52 r90
  text "5V POWER" at 29.55,19.35 h2
  text "TERM" at 122.8,17.4 h1 r90
  text "100k" at 79.8,16.7 h1 r90
  text "12V DIN" at 97.154,16.654 h1.52
  text "22k" at 66.5,16.6 h1 r90
  text "6" at 61.2,15.3 h2
  text "1" at 17.2,15.1 h2
  text "3" at 35.1,15.1 h2
  text "4" at 43.5,15.1 h2
  text "5" at 52.5,15.1 h2
  text "2" at 26,15 h2
  text "22k" at 97,13.3 h1 r90
  text ".1uF" at 66.5,12.6 h1 r90
  text ".1uF" at 79.8,12.5 h1 r90
  text "1N 1P" at 128.1,11.6 h1 r90
  text "60.4k" at 65,9.8 h1 r90
  text "60.4k" at 78.3,9.6 h1 r90
  text "UART5" at 118.7,4.4 h1 r90
  text "RX" at 113.7,1.5 h1 r90
  text "TX" at 116.4,1.4 h1 r90
  text "4  3  2  1" at 65.7,0.9 h1
  text "4  3  2  1" at 98.2,0.9 h1
  text "6  5  4  3  2  1" at 78.7,0.8 h1
  text "+ -" at 56.6,0.7 h1
  text "+ -" at 12.6,0.6 h1
  text "+ -" at 39,0.6 h1
  text "+ -" at 48,0.6 h1
  text "GND" at 111,0.6 h1 r90
  text "+ -" at 21.4,0.5 h1
  text "+ -" at 30.3,0.5 h1